# Altium PCB PCB_PowerBoard_7500-0430.PcbDoc (part 5 of 5)
Units mil, origin at the board's own origin, x right, y up, seen from the top; angles counter-clockwise.
Board outline 4000 x 3250 mil, 4 copper layers (Top Layer, Layer 1, Layer 2, Bottom Layer), stack 62.449 mil thick; 205 components, 100 nets, 1585 pads, 235 vias.
Unrouted connection lines stored in the file: 2.
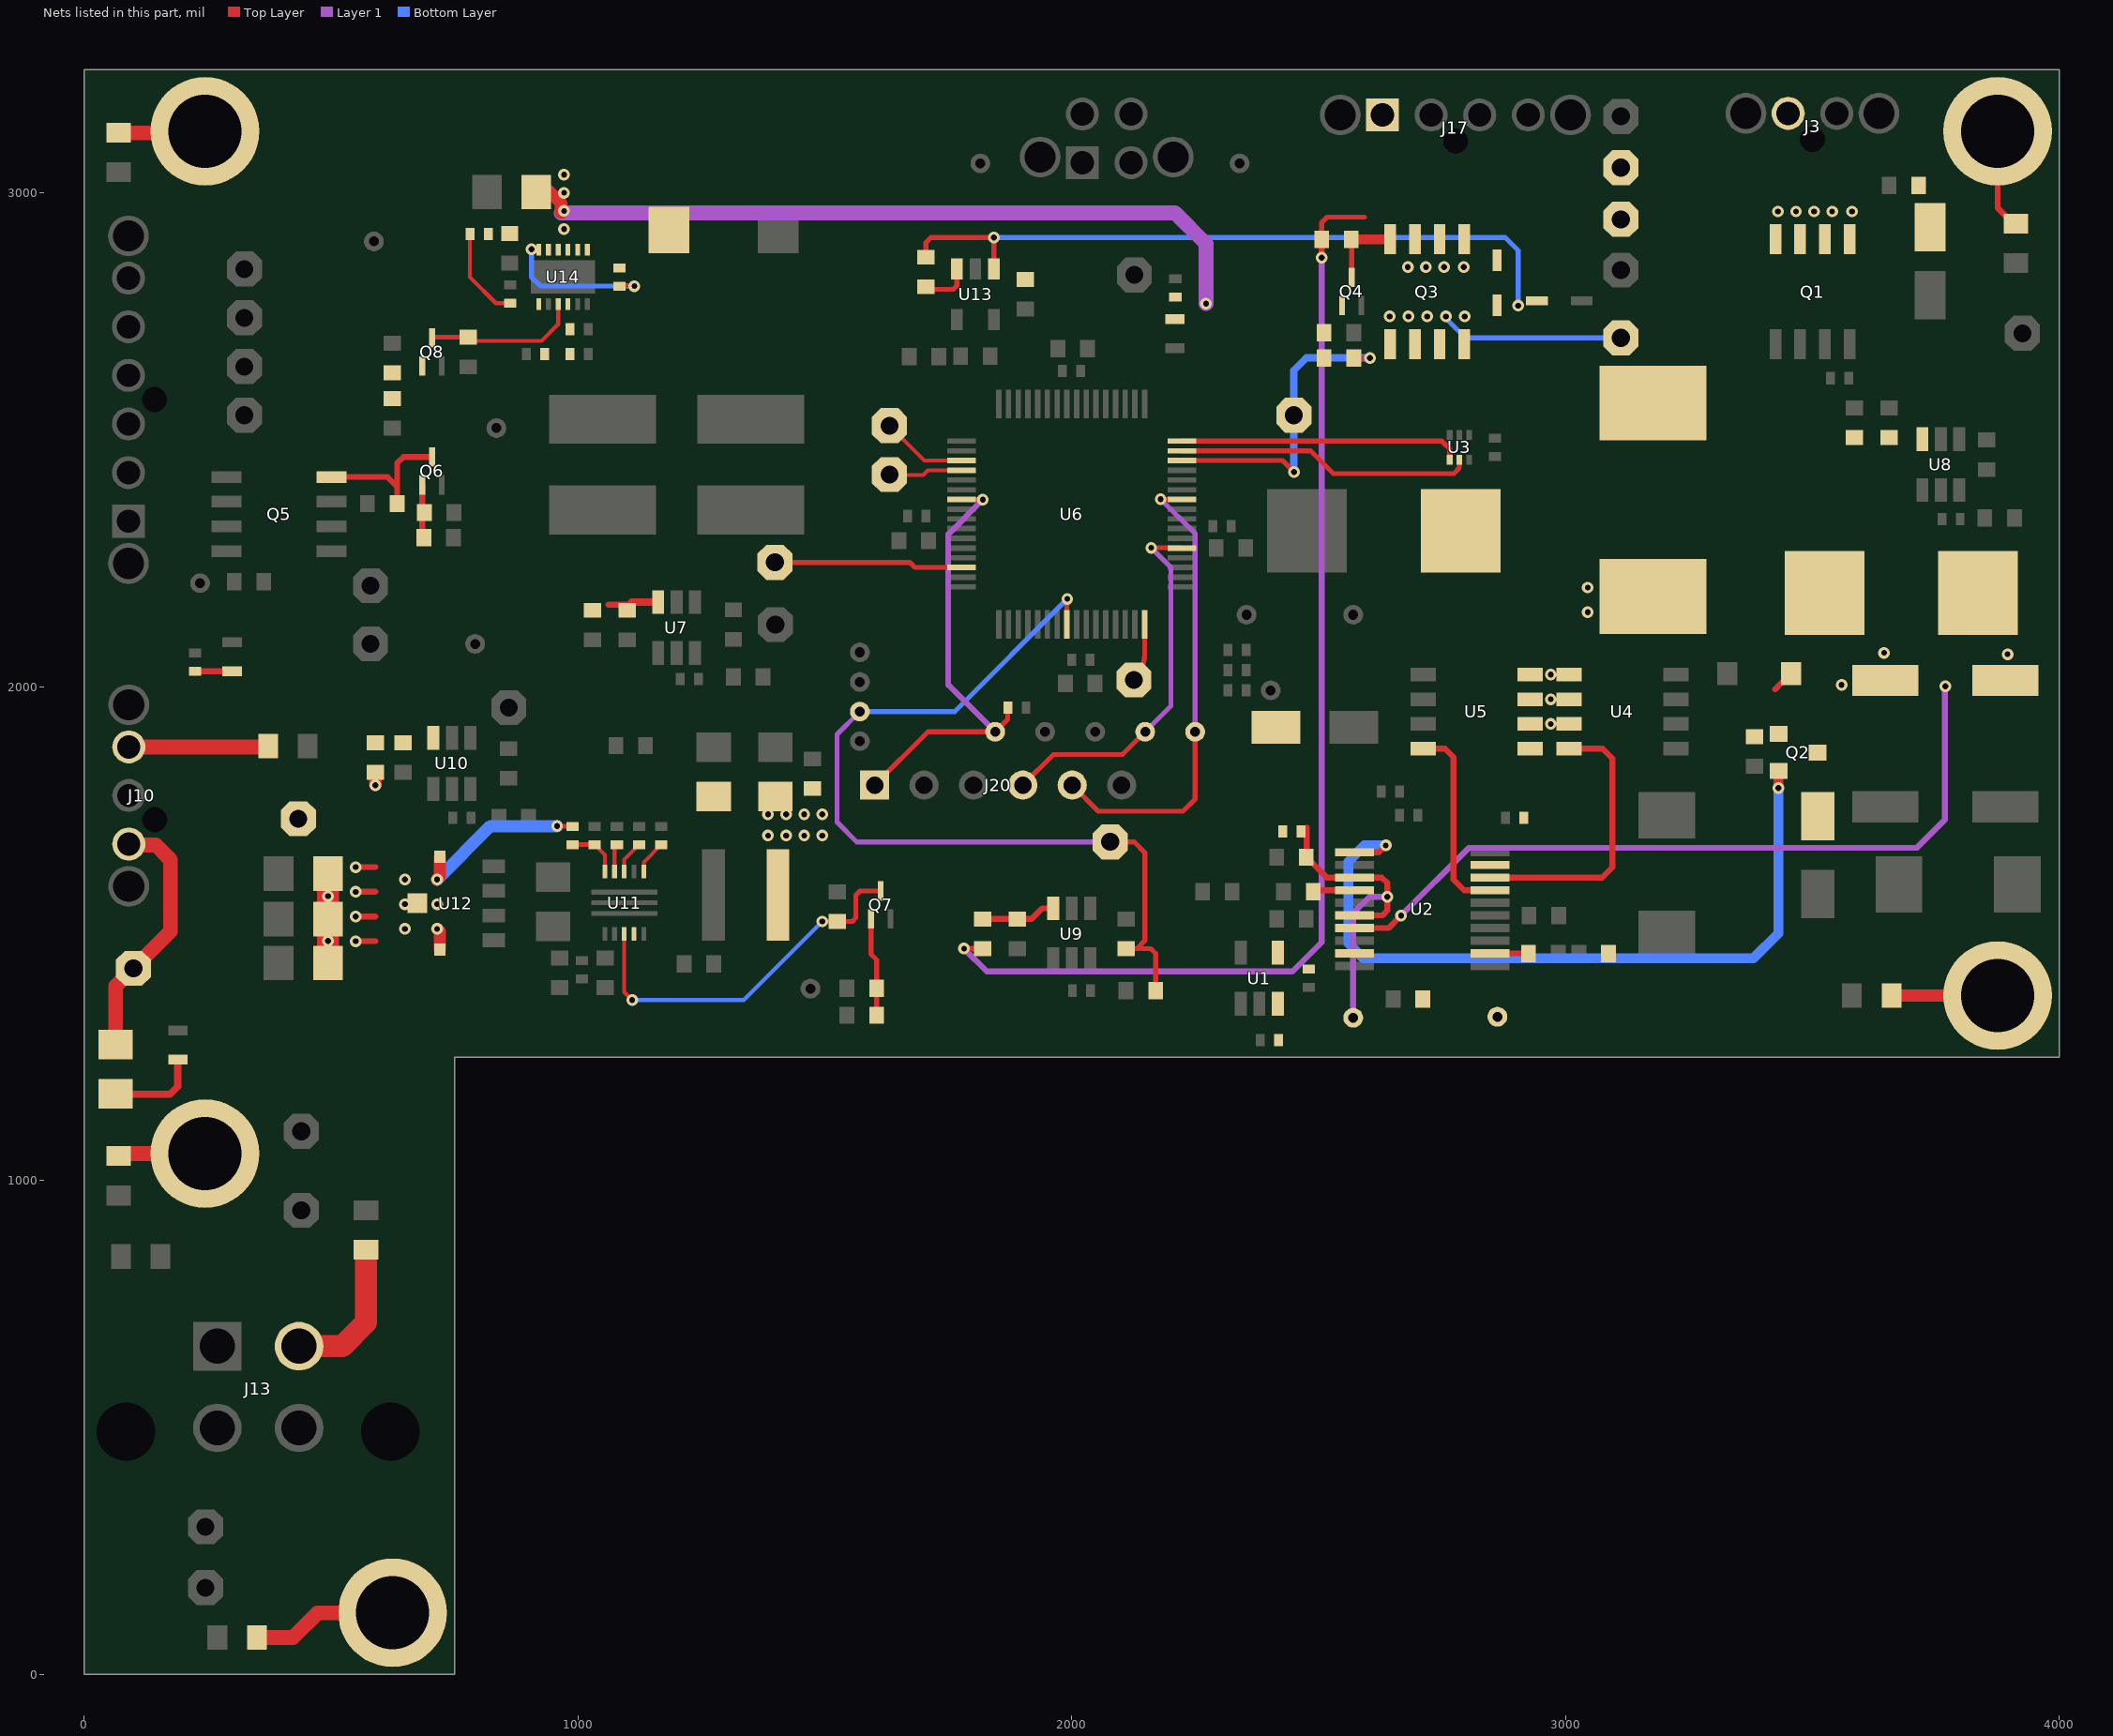
[diagram p5: the nets of this part, all layers, seen from the top]

## Via types
v1: diameter 23.62, hole 11.81, Top Layer to Bottom Layer, tented both sides, 232 vias
v2: diameter 23.62, hole 11.81, Top Layer to Bottom Layer, 3 vias

## Nets (pads, with @x,y where several pads share a name; then routed paths per layer and width w, separated by ;. In a path a pad name is that pad's centre, name@x,y a point inside that pad or via, vN(x,y) a via of type N, cw(c..) or ccw(c..) an arc to the next point about the centre after c; other vN are vias at no path point) (continued)
NetC43_2: C43.2 D6.1 D7.1 R51.1 U13.1 | length 1419.7
  Top Layer w10: R51.1@1705,2870 1705,2900 1715,2910 v1(1842.4,2910) U13.1@1842.4,2846.18
  Bottom Layer w10: v1(1842.4,2910) 2878,2910 2904,2884 v1(2904,2772)
NetC48_1: C48.1 U14.12 | length 304.8
  Top Layer w10: v1@909,2885 v1@909,2885.12 ; C48.1@1084,2811.5 v1(1114.5,2811.5)
  Bottom Layer w10: v1(906,2886) 906,2830 924.5,2811.5 v1(1114.5,2811.5) v1@1116.5,2811.5
NetC49_1: C49.1 R53.1 R55.1 U14.4
NetC50_2: C50.2 R57.2 U14.1 | length 190.7
  Top Layer w8: R57.2@781.5,2917 781.5,2869.71 781.5,2829.5 834,2777 C50.2@863,2777
NetD1_2: D1.2 R3.1
NetD3_2: D3.2 L1.2
NetD4_1: D4.1 Q2.1 R12.1 | length 47
  Top Layer w12: 3424.5,1995 3439,2009.5 3442,2009.5 3456.5,2024 D4.1@3456.5,2027
NetD5_2: D5.2 Q2.3
NetJ13_2: J13.2 R11.2 | length 298.5
  Top Layer w45: J13.2@435.39,664.87 522.87,664.87 571,713 R11.2@571,856
NetJ23_1: J23.1 U6.3 | length 175.1
  Top Layer w8: J23.1@1631,2529 1701.73,2458.27 U6.3@1776.77,2458.27
NetJ25_1: J25.1 U6.4 | length 150.2
  Top Layer w8: J25.1@1631,2430 1632,2429 1699,2429 1708.58,2438.58 U6.4@1776.77,2438.58
NetJ29_1: J29.1 U6.14 | length 382
  Top Layer w10: J29.1@1399,2252 1672.06,2252 1682.33,2241.73 U6.14@1776.77,2241.73
NetJ37_1: J37.1 U6.32 | length 118.6
  Top Layer w10: J37.1@2126,2014 ccw(c2073.76,2066.24) 2147.64,2066.24 U6.32@2147.64,2126.77
NetLED1_1: LED1.1 R42.1 | length 181.1
  Top Layer w15: R42.1@70,1175 174,1175 190,1191 LED1.1@190,1245.47
NetLED2_1: LED2.1 R52.1
NetLED3_1: LED3.1 R54.1 | length 75
  Top Layer w12: R54.1@225,2031.5 LED3.1@300,2031.47
NetMH1_MH: MH1.MH R17.2 | length 292.4
  Top Layer w30: R17.2@353.31,75 423,75 473,125 MH1.MH@625,125
NetMH2_MH: MH2.MH R18.2 | length 176.7
  Top Layer w30: R18.2@70,1053.31 70,1055 MH2.MH@245,1055
NetMH3_MH: MH3.MH R19.2 | length 218
  Top Layer w25: R19.2@3660,1375 MH3.MH@3875,1375 MH3.MH@3875,1378
NetMH4_MH: MH4.MH R20.2 | length 205.3
  Top Layer w12: MH4.MH@3875,3125 3875,2970 3907,2938 R20.2@3912,2938
NetMH5_MH: MH5.MH R21.2 | length 176.2
  Top Layer w29.53: R21.2@70,3122 242,3122 MH5.MH@245,3125
NetQ3_4: Q3.4 Q4.3 R13.2 | length 157.1
  Top Layer w10: R13.2@2566.3,2906.3 R13.2@2566,2906 2567,2906 Q4.3@2567,2829
  Top Layer w20: R13.2@2566.3,2906.3 Q3.4@2645,2906.3
NetQ4_1: Q4.1 R15.2 R16.1
NetQ5_4: Q5.4 Q6.3 R38.1 | length 298.5
  Top Layer w12: Q5.4@501.3,2425 615,2425 634,2406 ; R38.1@634,2371 634,2406 ; Q6.3@704.68,2465.69 646.69,2465.69 634,2453 634,2406
NetQ6_1: Q6.1 R39.2 R41.1 | length 108.2
  Top Layer w12: Q6.1@685,2409 685,2305 R39.2@688,2302
NetQ7_1: Q7.1 R45.2 R46.1 | length 199.7
  Top Layer w10: Q7.1@1593.63,1530 1593.63,1458.37 1605,1447 R45.2@1605,1390 R46.1@1605,1335
NetQ7_3: Q7.3 R100.2 U11.11 | length 762
  Top Layer w8: U11.11@1094,1499.66 1094,1382 v1(1110,1366)
  Top Layer w10: v1(1495,1525) R100.2@1525,1525 1556,1525 1563,1532 1563,1578 1571.69,1586.69 Q7.3@1613.32,1586.69
  Bottom Layer w8: v1(1110,1366) 1336,1366 v1(1495,1525)
NetQ8_1: Q8.1 R58.2 R60.1
NetQ8_3: Q8.3 R56.2 U14.3 | length 313.6
  Top Layer w8: Q8.3@704.68,2706.69 Q8.3@705.99,2708 ; R56.2@778,2708 785.29,2700.71 926.71,2700.71 960.16,2734.16 U14.3@960.16,2774.88
  Top Layer w10: Q8.3@705.99,2708 R56.2@778,2708
NetR5_1: R5.1 U2.12 | length 78
  Top Layer w12: U2.12@2847.44,1460.43 2925,1460.43 R5.1@2925,1460
NetR6_1: R6.1 U2.4 | length 85
  Top Layer w12: R6.1@2489,1585 2492.39,1588.39 U2.4@2572.56,1588.39
NetR26_1: R26.1 R30.2 U7.3 | length 102.7
  Top Layer w12: 1062,2166.5 1103.5,2166.5 1108.57,2171.57
  Top Layer w15: 1108.57,2171.57 U7.3@1162.6,2171.57
NetR27_1: R27.1 R31.2 U8.3
NetR32_1: R32.1 R36.2 U9.3 | length 151.5
  Top Layer w12: R32.1@1820,1530 R36.2@1890,1530 1919,1530 1940.57,1551.57 U9.3@1962.6,1551.57
NetR33_1: R33.1 R37.2 U10.3
NetR44_1: R44.1 R47.2 U11.5 | length 108.4
  Top Layer w8: R47.2@1034,1680.53 1054.63,1659.9 U11.5@1054.63,1625.65
  Top Layer w10: R44.1@989,1680.53 R47.2@1034,1680.53
NetR48_2: R48.2 U11.1 | length 69.6
  Top Layer w8: U11.1@1133.37,1625.65 1133.37,1644.9 R48.2@1169,1680.53
NetR49_2: R49.2 U11.3 | length 67.3
  Top Layer w8: U11.3@1094,1625.65 1094,1650.53 R49.2@1124,1680.53
NetR50_2: R50.2 U11.4 | length 56.8
  Top Layer w8: U11.4@1074.32,1625.65 1074.32,1675.84 R50.2@1079,1680.53
NetR51_2: R51.2 U13.3 | length 101.4
  Top Layer w10: R51.2@1705,2810 1710,2805 1760,2805 1767.6,2812.6 U13.3@1767.6,2846.18
NetU2_17: U2.17 U5.4 | length 399.7
  Top Layer w12: U5.4@2711.73,1875 2756,1875 2773,1858 2773,1610 2794.61,1588.39 U2.17@2847.44,1588.39
NetU2_18: U2.18 U4.4 | length 572.8
  Top Layer w12: U2.18@2847.44,1613.98 3073.98,1613.98 3095,1635 3095,1855 3075,1875 U4.4@3006.73,1875
PC_PWR_12V: C38.2 C39.2 C40.2 J9.1 J10.1 J45.1 R33.2 R42.2 R44.2 U12.5_6 U12.7 U12.8 | length 1296.8
  Top Layer w10: v1(958,1718) 958.47,1717.53 R44.2@989,1717.53
  Top Layer w12: v1(550,1485) 590,1485 ; v1(550,1535) 590,1535 ; v1(550,1585) 590,1585 ; v1(550,1635) 590,1635
  Top Layer w25: v1(590,1801) R33.2@590,1827 ; v1(715,1510) 720.54,1504.46 U12.7@720.54,1468 ; v1(715,1610) 720.54,1615.54 U12.8@720.54,1656
  Top Layer w30: R42.2@64,1276 64,1394 J45.1@100,1430 175,1505 175,1650 145,1680 92,1680 J10.1@90,1682
  Top Layer w45: C40.2@494,1441 C39.2@494,1530 C38.2@494,1622
  Bottom Layer w25: v1(715,1610) 823,1718 v1(958,1718)
  other v1: 494,1485.5 650,1510 650,1560 715,1560 494,1576 650,1610
PC_PWR_CHASSIS: J10.3 R40.2 | length 284
  Top Layer w29.53: R40.2@373,1878.43 R40.2@373,1880
  Top Layer w30: J10.3@90.62,1878.43 R40.2@373,1878.43
PHASE1-2: C48.2 L3.1 U14.7 U14.8
PICKIT3_PGC: J20.5 J26.1 U6.42 | length 960.1
  Top Layer w10: J20.5@2001,1801 2054,1748 2225,1748 2250,1773 J26.1@2250,1909 ; v1@2180.47,2379.53 U6.42@2223.23,2379.53
  Layer 1 w10: v1(2180,2380) 2250,2310 J26.1@2250,1909
PICKIT3_PGD: J20.4 J24.1 U6.37 | length 765.8
  Top Layer w10: J20.4@1901,1801 1963,1863 2102.75,1863 J24.1@2148.75,1909 ; v2(2161,2281.61) 2222.72,2281.61 U6.37@2223.23,2281.1
  Layer 1 w10: J24.1@2148.75,1909 2201,1961.25 2201,2241.61 v2(2161,2281.61)
PSW_MON: C30.1 J39.1 J40.1 R34.2 U6.24 | length 1804.1
  Top Layer w10: U6.24@1990.16,2126.77 1990.16,2177.16 v1(1991,2178) ; J39.1@2078,1686 2126.57,1686 2148,1664.57 2148,1486 2132,1470 ; R34.2@2110,1470 2132,1470 ; R34.2@2110,1472.5 R34.2@2110,1478.04 ; C30.1@2170,1384.35 C30.1@2170,1385 2170,1460 2160,1470 2132,1470
  Layer 1 w10: J40.1@1571,1950 1525,1904 1525,1726 1565,1686 J39.1@2078,1686
  Bottom Layer w10: J40.1@1571,1950 1763,1950 v1(1991,2178)
PSW_OUT: D7.2 J16.1 J17.1 Q3.1 Q3.2 Q3.3 R13.1 R32.2 | length 2353.6
  Top Layer w10: R13.1@2506,2906 2506,2940 2517,2951 2592.54,2951
  Top Layer w12: v1(1782,1470) R32.2@1820,1470 ; v1(2506,2869) R13.1@2506,2906
  Layer 1 w12: v1(1782,1470) 1828,1424 2447,1424 2506,1483 v1(2506,2869)
  other v1: 2680.67,2850 2717.33,2850 2754,2850 2794,2850
REF_4.096V: C6.1 C8.2 J5.1 R4.1 U1.4 U2.9
STAT_LED_R\E\D\/GRN: U3.2 U6.47 | length 602.2
  Top Layer w10: U6.47@2223.23,2477.95 2484.05,2477.95 2530,2432 2774,2432 2785,2443 U3.2@2785,2459.88
STAT_LED_RED/G\R\N\: U3.1 U6.48 | length 570.5
  Top Layer w10: U6.48@2223.23,2497.64 2749.36,2497.64 2750.41,2496.59 ; 2750.41,2496.55 2755.68,2491.28 2765.32,2481.68 U3.1@2765.32,2459.88
U1_CS: D3.1 R7.1 R8.1 U2.7 | length 1556.7
  Top Layer w12: U2.7@2572.56,1511.61 2641.61,1511.61 v1(2667,1537)
  Layer 1 w12: v1(2667,1537) 2804,1674 3711,1674 3768,1731 3768,2000 v1(3769,2001)
  other v1: 3559,2004 3895,2066 3645,2069
U1_IOUT: Q2.2 U2.1 | length 1557.7
  Top Layer w12: U2.1@2572.56,1665.16 2622.16,1665.16 v1(2636,1679)
  Top Layer w20: v2(3431,1795) Q2.2@3431,1828.97
  Top Layer w25: Q2.2@3431,1828.97 Q2.2@3431.63,1829.6
  Bottom Layer w20: v1(2636,1679) 2593,1679 2560,1646 2560,1481 2591,1450 3380,1450 3431,1501 v2(3431,1795)
U1_LX: C10.2 D2.1 L1.1 U2.19 U4.1 U4.2 U4.3 U5.5 U5.6 U5.7 U5.8
  other v1: 2970,1925 2970,1975 2970,2025 3045,2151 3045,2201
U1_VL: C5.1 C7.1 J4.1 R3.2 U1.3 U2.3 U2.6 | length 667.8
  Top Layer w12: 2476,1715 2476,1651.5 2484,1643.5 2487.5,1643.5 2517.02,1613.98 2628.02,1613.98 2639,1603 v1(2639,1575) 2639,1547 2629.2,1537.2 U2.6@2572.56,1537.2
  Layer 1 w12: J4.1@2570,1330 2570,1542 2603,1575 v1(2639,1575)
U14_VDD: C47.2 R57.1 U14.11
V_CHRGR: C1.1 C2.2 J1.1 J3.1 Q1.5 Q1.6 Q1.7 Q1.8
  other v1: 3430,2962.6 3466.67,2962.6 3503.33,2962.6 3540,2962.6 3580,2962.6
VBAT_SW: C31.2 C32.2 C46.2 J19.1 L2.1 Q3.5 Q3.6 Q3.7 Q3.8 R14.2 U11.12 U14.9 U14.10 | length 1864.8
  Top Layer w25: C46.2@940,3005 966,2979 v1@966,2960
  Layer 1 w30: v1@966,2960 2209,2960 2272,2897 v1(2272,2776)
  Bottom Layer w10: v1@2754,2750 2797.33,2706.67 J19.1@3092,2706.67
  other v1: 1385,1699 1421.67,1699 1458.33,1699 1495,1699 1385,1742 1421.67,1742 1458.33,1742 1495,1742 2644,2750 2682,2750 2720,2750 2758,2750 2796,2750 972,2927 972,2963.67 972,3000.33 972,3037
VBATSW_EN: J18.1 R15.1 U6.46 | length 639.8
  Top Layer w10: U6.46@2223.23,2458.27 2426.73,2458.27 v1(2450,2435) ; R15.1@2571,2666 v1(2604,2666)
  Bottom Layer w15: v1(2450,2435) J18.1@2450,2550 2450,2641 2475,2666 v1(2604,2666)
VPP_M\C\L\R\: J20.1 J22.1 R22.1 U6.7 | length 929.5
  Top Layer w10: J20.1@1601,1801 1709,1909 J22.1@1845,1909 1870.5,1934.5 R22.1@1870.5,1958 ; U6.7@1776.77,2379.53 v1@1819.53,2379.53
  Layer 1 w12: v1(1820,2379.06) 1750,2309.06 1750,2004 J22.1@1845,1909
pads on no net: J3. J3.S1 J3.S2 J7.3 J7.4 J7.S1 J7.S2 J10. J10.S1 J10.S2 J13. J17. J17.S1 J17.S2 J20.6 J43. J43.S1 J43.S2 U1.1 U1.5 U6.5 U6.6 U6.8 U6.11 U6.12 U6.13 U6.21 U6.22 U6.23 U6.28 U6.29 U6.30 U6.31 U6.36 U6.39 U6.40 U6.43 U6.44 U6.45 U6.53 U6.54 U6.55 U6.58 U6.59 U6.60 U6.61 U6.62 U6.63 U6.64 U13.4

## Polygon pours and split planes (outlines as drawn)
GND on Top Layer "GND_L01_P031" (solid, remove dead copper, pour order 31): 0,0 750,0 750,1250 4000,1250 4000,3250 0,3250
DCIN_S on Top Layer "DCIN_S_L01_P007" (solid, remove dead copper, pour order 7): 3405,2600 3405,2550 3605,2550 3605,2585 3546,2585 3546,2767 3405,2767
U1_LX on Top Layer "U1_LX_L01_P008" (solid, remove dead copper, pour order 8): 2690,2205 2690,2090 2900,2090 2900,1650 2805,1650 2805,1630 3075,1630 3075,2100 3295,2100 3295,2410 2690,2410
5VPIC on Top Layer "5VPIC_L01_P011" (solid, remove dead copper, pour order 11): 2230,2883 2232,2881 2232,2819 2226,2813 2187,2813 2181,2807 2181,2795 1995.69,2795 1995.69,2542 1982.69,2542 1982.69,2620 1819,2620 1819,2767 1869,2767 1869,2730 1943.69,2730 1943.69,2883
NetC36_2 on Top Layer "NETC36_2_L01_P036" (solid, remove dead copper, pour order 36): 998,1568 994,1568 902,1568 902,1604 801,1604 801,1373 979,1373 979,1421 912,1421 912,1477 998,1477 998,1535 1168,1535 1168,1548 998,1548
5V_OK on Top Layer "5V_OK_L01_P035" (solid, pour order 35): 1713,2717 1748,2717 1748,2504 1807,2504 1807,2490 1717,2490 1713,2490
12V_MON on Top Layer "12V_MON_L01_P034" (solid, remove dead copper, pour order 34): 834,1780 883,1780 883,1711 940,1711 940,2020 810,2020 810,1911 899,1911 899,1831 834,1831
BUFFOUT4 on Top Layer "BUFFOUT4_L01_P033" (solid, remove dead copper, pour order 33): 691,1766 720,1766 720,1844 881,1844 881,1902 798,1902 798,1927 767,1927 767,1864 691,1864
5VPIC on Top Layer "5VPIC_L01_P010" (solid, remove dead copper, pour order 10): 2036,2158 2036,2071 2075,2071 2075,1986 2023,1986 2023,2158 2023,1986 2023,2158
DCIN_S on Top Layer "DCIN_S_L01_P029" (solid, remove dead copper, pour order 29): 3349,2087 3349,1687 3127,1687 3127,2087
IB_PWR_5V on Top Layer "IB_PWR_5V_L01_P028" (solid, remove dead copper, pour order 28): 212,2440 212,2372 20,2372 20,2145 330,2145 330,2440
5V on Top Layer "5V_L01_P026" (solid, remove dead copper, pour order 26): 1013,2746 1013,2693 1013,2746 1005,2746 1005,2598 934,2598 934,2454 1540,2454 1540,2972 1446.33,2972 1446.33,2746
U14_VDD on Top Layer "U14_VDD_L01_P025" (solid, remove dead copper, pour order 25): 933,2873 933,2903 807,2903 807,2941 946,2941 946,2873
NetC49_1 on Top Layer "NETC49_1_L01_P024" (solid, remove dead copper, pour order 24): 985,2788 985,2742 998,2742 998,2655 921,2655 921,2687 974,2687 974,2788
VBAT_SW on Top Layer "VBAT_SW_L01_P023" (solid, remove dead copper, pour order 23): 885,2947 954,2947 954,2873 985,2873 985,3053 885,3053
PHASE1-2 on Top Layer "PHASE1-2_L01_P022" (solid, remove dead copper, pour order 22): 1143,2976 1143,2837 1055,2837 1055,2873 993,2873 993,2976
PSW_OUT on Top Layer "PSW_OUT_L01_P018" (solid, remove dead copper, pour order 18): 2665,2899 2665,2819 2914,2819 2914,2900 3160,2900 3160,2998 2662,2998 2662,3229 2557,3229 2557,2945 2665,2945
5VPIC on Top Layer "5VPIC_L01_P015" (solid, remove dead copper, pour order 15): 1693,2361.68 1737,2361.68 1737,2326.68 1806,2326.68 1806,2313.68 1737,2313.68 1737,2274.68 1693,2274.68
NetD3_2 on Top Layer "NETD3_2_L01_P014" (solid, remove dead copper, pour order 14): 3306,2476 3432,2476 3432,2097 3604,2097 3604,2454 3481,2454 3481,2534 3306,2534
BATT+ on Top Layer "BATT+_L01_P013" (solid, remove dead copper, pour order 13): 3964,1790 3964,1683 3746,1683 3746,1480 3416,1480 3416,1663 3571,1663 3571,1790
5VPIC on Top Layer "5VPIC_L01_P012" (solid, remove dead copper, pour order 12): 2307,2342 2263,2342 2263,2307 2194,2307 2194,2294 2263,2294 2263,2255 2307,2255
NetD1_2 on Top Layer "NETD1_2_L01_P009" (solid, pour order 9): 2359,1846 2402,1846 2402,1691 2440,1691 2440,1847 2474,1847 2474,1959 2359,1959
V_CHRGR on Top Layer "V_CHRGR_L01_P006" (solid, remove dead copper, pour order 6): 3410,2865 3780,2865 3780,3035 3690.5,3035 3690.5,2978 3500,2978 3500,3230 3410,3230
REF_4.096V on Top Layer "REF_4.096V_L01_P004" (solid, remove dead copper, pour order 4): 3072,1367 2691,1367 2691,1289 3103,1289 3103,1480 3072,1480
U1_VL on Top Layer "U1_VL_L01_P002" (solid, remove dead copper, pour order 2): 2404,1383 2438,1383 2438,1365 2609,1365 2609,1257 2404,1257
REF_4.096V on Top Layer "REF_4.096V_L01_P001" (solid, pour order 1): 2732,1451 2732,1347 2691,1347 2691,1451 2503,1451 2503,1418 2391,1418 2391,1494 2520,1494 2520,1471 2732,1471
VBAT_SW on Top Layer "VBAT_SW_L01_P000" (solid, remove dead copper, pour order 0): 1361,1697 1224,1697 1224,1816 1508,1816 1508,1687 1447,1687 1447,1387 1106,1387 1106,1516 1121,1516 1121,1398 1361,1398
V_CHRGR on Layer 2 "V_CHRGR_L03_P017" (solid, remove dead copper, pour order 17): 3287,3000 3287,2917 3747,2917 3747,3076.76 3597,3076.76 3597,3232 3287,3232 3287,3104 3038,3104 3038,3000
PC_PWR_12V on Layer 2 "PC_PWR_12V_L03_P037" (solid, remove dead copper, pour order 37): 696,1841 696,1703 730,1703 730,1430 169,1430 169,1376 24,1376 24,1841
BATT+ on Layer 2 "Polygon_1_Net_BATT+" (solid, remove dead copper, pour order 3): 2834,1698 2834,2287 3016,2287 3016,3241 2840,3241 2840,2612 2493,2612 2493,1501 750,1501 750,1411 350,1411 350,850 730,850 730,1270 3991,1270 3991,1698
DCIN_S on Layer 2 "DCIN_S_L03_P005" (solid, remove dead copper, pour order 5): 3040,2285 3130.65,2285 3131.34,1733 3497,1733 3497,2197 3589,2197 3589,2895 3040,2895
GND on Layer 2 "GND_L03_P040" (solid, remove dead copper, pour order 40): 0,0 750,0 750,1250 4000,1250 4000,3250 0,3250
U1_LX on Layer 2 "Polygon_1_Net_U1_CS" (solid, remove dead copper, pour order 39): 2866,1735 2866,2248.25 3094,2248.25 3094,1735
U1_CS on Layer 2 "Polygon_1_Net_U1_CS" (solid, remove dead copper, pour order 38): 3536,2110 3988.5,2110 3988.5,1896 3536,1896
5VPIC on Layer 2 "5VPIC_L03_P016" (solid, remove dead copper, pour order 16): 750,1728 717,1728 717,1806 717,1943 1218,1943 1218,1669 1914,1669 1914,2236 1808,2236 1808,2613 2325,2613 2325,1515 750,1515
VBAT_SW on Layer 2 "Polygon_1_Net_VBAT_SW" (solid, remove dead copper, pour order 20): 1899,2223 1891,2223 1791,2223 1791,2635.64 2818,2635.64 2818,2811 1714.5,2811 1714.5,1942 1236,1942 1236,1685.64 1899,1685.64
5V on Layer 2 "Polygon_1_Net_5V" (solid, remove dead copper, pour order 21): 1699,1959 1699,2885 1350,2885 1350,2755.5 399.5,2755.5 399.5,1959
IB_PWR_5V on Layer 2 "IB_PWR_5V_L03_P027" (solid, remove dead copper, pour order 27): 338,2448 338,2115 20,2115 20,2448
PSW_OUT on Layer 2 "PSW_OUT_L03_P019" (solid, remove dead copper, pour order 19): 2558,2824 2814,2824 2814,3071 2680,3071 2680,3237 2558,3237
GND on Layer 1 "GND_L02_P030" (solid, remove dead copper, pour order 30): 0,0 750,0 750,1250 4000,1250 4000,3250 0,3250
GND on Bottom Layer "GND_L04_P032" (solid, remove dead copper, pour order 32): 0,0 750,0 750,1250 4000,1250 4000,3250 0,3250

## Other copper
Top Layer:
  rectangle net 5V_MON: 1352,2002 1397,2062
  rectangle net NetR33_1: 570,1873 720,1923
  rectangle net NetR27_1: 3564,2469 3736,2536
  rectangle net VBAT_SW: 1361,1421 1447,1720
  rectangle net NetD3_2: 3351,2454 3481,2538
  rectangle net NetD3_2: 3058,2454 3398,2648
  rectangle net PHASE1-2: 1054,2836 1231,2976
  rectangle net 5V: 1344,2743 1542,2975
  rectangle net VBAT_SW: 2625,2640 2818,2766
  rectangle net U1_VL: 2455,1634 2495,1723
  rectangle net U1_LX: 2900,2021 3075,2115
  rectangle net U1_LX: 2813,2106 3286,2260
  region net NetD4_1: 3477,2000 3477,2056.58 3399,2056.58 3399,2000
  rectangle net NetC48_1: 893,2872 926,2899
  rectangle net BATT+: 393,895 600,991
  rectangle net PC_PWR_12V: 463,1392 771,1672
  rectangle net 5V: 1525,2639 1687,2699
  rectangle net GND: 715,2630 753,2678
  rectangle net BATT-: 52,830 98,876
  rectangle net 5VPIC: 729,1718 756,1823
  rectangle net 5VPIC: 729,1766 797,1823
  rectangle net 5VPIC: 2301,1974 2329,2115
  rectangle net NetC12_1: 2307,1567 2446,1604
  rectangle net GND: 1951,1983 2011,2071
  rectangle net 5V_MON: 1352,2049 1609,2167
  rectangle net GND: 1081,2080 1126,2110
  rectangle net NetQ8_1: 606,2569 691,2670
  rectangle net 5VPIC: 1187,1999 1220,2095
  rectangle net 5VPIC: 1187,2042 1252,2095
  rectangle net 5V: 400,2258 596,2400
  rectangle net 5V: 212.5,2056 237.5,2079
  rectangle net 5V_MON: 1292,2079 1376,2115
  rectangle net BUFFOUT3: 1225,2137 1340,2196
  rectangle net NetR26_1: 1007,2137 1117,2196
  rectangle net NetC50_2: 849,2762 926,2787
  rectangle net NetLED2_1: 2190,2735 2230,2800
  rectangle net NetC43_2: 1830,2810 1925,2870
  rectangle net DCIN_S: 3009,2769 3160,2888
  rectangle net NetC43_2: 2829,2745 2965,2800
  rectangle net NetQ4_1: 2496,2753 2553,2792
  rectangle net NetQ4_1: 2496,2645 2529,2791
  rectangle net BUFFOUT1: 3783,2475 3876,2532
  rectangle net DCIN_MON: 3833,2425 3932,2459
  rectangle net DCIN_MON: 3892,2323 3932,2459
  rectangle net 5VPIC: 3746,2328 3771,2424
  rectangle net 5VPIC: 3746,2372 3810,2424
  rectangle net U1_CS: 3746,1980 3966,2293
  rectangle net U1_CS: 3540,1958 3966,2081
  rectangle net NetD4_1: 3364,1881 3451,2056
  rectangle net NetD5_2: 3470,1688 3547,1894
  region net NetC10_1: 2623,1956.16 2520.44,1956.16 2520.44,1810.16 2623,1810.16
  rectangle net NetC10_1: 2805,1657 2890,1803
  rectangle net BATT_THERM+: 2967,1386 3044,1479
  rectangle net 5VPIC: 1987,1368 2014,1473
  rectangle net 5VPIC: 1987,1423 2051,1473
  rectangle net L1_OUT: 1238,1420 1302,1687
  rectangle net L1_OUT: 1026,1555 1267,1569
  rectangle net NetC36_2: 944,1373 1021,1421
  rectangle net NetC37_1: 921,1434 1021,1466
  rectangle net NetC36_2: 1156,1535 1168,1547.01
  rectangle net BATT+: 565,917 596,962
  pour cut-out: 2926,2632 3418,2632 3418,2086 2926,2086
  pour cut-out: 1238,1687 1238,1472 1447,1472 1447,1687
  pour cut-out: 1144,3078 1452,3078 1452,2770 1142,2770 1142,3077
Layer 1:
  rectangle net VBAT_SW: 921,2913 997,3057
  rectangle net NetC10_1: 2520.44,1766 2890,1845

## Silkscreen, mask and mechanical layers (free items; w line width, h text height)
Top Overlay:
  region: 1295,3099.41 1295,3229.41 1695,3229.41 1695,3099.41
  lines w5: 2352,1650 2396,1650
  lines w8: 380,3150 475,3230 570,3150 490,3060 490,3132 525,3132 525,3168 425,3168 425,3132 460,3132 460,3060 380,3150
  text "TransTech Systems, Inc" at 595,3193 h54.25
  text "PCB: 1700-0003 REV-A" at 595,3143 h54.25
  text "GND" at 3162,3136.7 h60
  text "PCA: 7500-0430 REV-A" at 595,3093 h54.25
  text "LEDRED" at 1568,3041 h60
  text "VCHRGR" at 3161,3032.7 h60
  text "LEDBLK" at 2265,2987 h60
  text "5VOK" at 460,2933.7 h60
  text "PSWOUT" at 3161,2926.7 h60
  text "!SS" at 376,2827.7 h60
  text "DCINS" at 3161,2824.7 h60
  text "5VPIC" at 2003,2748.7 h60
  text "SCLK" at 376,2729.04 h60
  text "VBATSW" at 3161,2686.7 h60
  text "MISO" at 376,2631.37 h60
  text "DCIN" at 3861,2627.64 h60
  text "MON" at 3856,2572 h60
  text "VBATSWEN" at 2501,2532.7 h60
  text "MOSI" at 376,2531.7 h60
  text "RG0" at 1483,2510.7 h60
  text "!5VEN" at 760,2436.7 h60
  text "RG1" at 1489.03,2411.7 h60
  text "RF4" at 1448,2222 h60
  text "IBPWREN" at 631,2187 h60
  text "5VIB" at 180,2140.7 h60
  text "SCL" at 2386,2126.7 h60
  text "SDA" at 2602,2126.7 h60
  text "5VMON" at 1451,2108.7 h60
  text "5VTP" at 835,2071.7 h60
  text "5V" at 631,2069.7 h60
  text "5V2AD" at 1607,2053.53 h45
  text "!INT" at 2385,2022 h60
  text "12V2AD" at 1607,1994.78 h45
  text "12VMON" at 911,1937.7 h60
  text "PSW2AD" at 1607,1935.11 h45
  text "DCIN2AD" at 1607,1875.48 h45
  text "12VTP" at 365,1784 h60
  text "PSWMON" at 2129,1668.7 h60
  text "12V" at 57,1481 h60
  text "!12VEN" at 1262,1369 h60
  text "U1REF" at 2900,1314.7 h60
  text "U1VL" at 2605,1285.7 h60
  text "BATT-(GND)" at 423.78,1160.85 h50
  text "BATT+" at 422.28,990.43 h60
  text "THERM+" at 297,280 h60
  text "THERM-" at 297,158 h60
Board_Outline:
  the board outline again, w10
Mechanical 4:
  drawing of 506 lines, arcs and shapes, not listed
  text "2" at 3695,3160 h54.25 r180
  text "1" at 1875,3060 h54.25
  text "2" at 2275,3060 h54.25
  text "1" at 2629.13,3058.98 h54.25
  text "4" at 2929.13,3058.98 h54.25
  text "+" at 3788,2974 h100.75 r270
  text "1" at 2691,2892 h54.25
  text "1" at 1855,2845 h54.25
  text "K" at 2765,2785 h54.25 r180
  text "K" at 2915,2760 h54.25 r90
  text "1" at 3409,2708 h54.25 r180
  text "K" at 2220,2690 h46.5 r180
  text "1" at 3810,2590 h54.25
  text "49" at 2159,2559 h54.25
  text "1" at 1793,2509 h54.25
  text "1" at 200,2355 h77.5 r180
  text "K" at 2890,2355 h77.5
  text "K" at 3865,2350 h77.5
  text "1" at 487,2259 h54.25 r270
  text "1" at 1255,2175 h54.25
  text "33" at 2207,2153 h54.25
  text "17" at 1843,2105 h54.25
  text "K" at 270,2085 h46.5
  text "1" at 2653,2041 h54.25 r90
  text "1" at 3023,2041 h54.25 r90
  text "K" at 3305.91,1985.08 h48.83 r270
  text "1" at 795,1895 h54.25
  text "1" at 1515,1795 h54.25
  text "K" at 2535,1795 h77.5 r180
  text "1" at 2575,1680 h77.5 r90
  text "1" at 170,1675 h77.5 r270
  text "1" at 1185,1640 h54.25
  text "1" at 2050,1550 h54.25
  text "K" at 3375,1480 h77.5 r90
  text "1" at 805,1450 h54.25 r270
  text "1" at 2330,1360 h77.5 r180
  text "K" at 160,1310 h46.5
  text "1" at 307,818 h77.5 r180
  text "2" at 464,817 h77.5 r180
  text "(GND)" at 324.26,128.35 h54.25
Mechanical 6:
  the board outline again, w5
Fabrication:
  drawing of 295 lines, arcs and shapes, not listed
  text "Layer" at 4556.09,1261 h60
  text "Name" at 4966,1261 h60
  text "Material" at 5895.74,1261 h60
  text "Thickness" at 6755.51,1261 h60
  text "Constant" at 7405.35,1261 h60
  text "Board Layer Stack" at 7975.21,1261 h60
  text "Top Overlay" at 4966,1141 h60
  text "Top Solder" at 4966,1021 h60
  text "Solder Resist" at 5895.74,1021 h60
  text "0.40mil" at 6755.51,1021 h60
  text "3.5" at 7405.35,1021 h60
  text "1" at 4556.09,901 h60
  text "Top Layer" at 4966,901 h60
  text "1.38mil" at 6755.51,901 h60
  text "Dielectric 2" at 4966,781 h60
  text "PP-006" at 5895.74,781 h60
  text "8.28mil" at 6755.51,781 h60
  text "4.4" at 7405.35,781 h60
  text "2" at 4556.09,661 h60
  text "Layer 1" at 4966,661 h60
  text "CF-004" at 5895.74,661 h60
  text "0.60mil" at 6755.51,661 h60
  text "Dielectric 1" at 4966,541 h60
  text "FR-4" at 5895.74,541 h60
  text "41.93mil" at 6755.51,541 h60
  text "4.6" at 7405.35,541 h60
  text "3" at 4556.09,421 h60
  text "Layer 2" at 4966,421 h60
  text "CF-004" at 5895.74,421 h60
  text "0.60mil" at 6755.51,421 h60
  text "Dielectric 3" at 4966,301 h60
  text "PP-006" at 5895.74,301 h60
  text "8.28mil" at 6755.51,301 h60
  text "4.4" at 7405.35,301 h60
  text "4" at 4556.09,181 h60
  text "Bottom Layer" at 4966,181 h60
  text "1.38mil" at 6755.51,181 h60
  text "Bottom Solder" at 4966,61 h60
  text "Solder Resist" at 5895.74,61 h60
  text "0.40mil" at 6755.51,61 h60
  text "3.5" at 7405.35,61 h60
  text "Bottom Overlay" at 4966,-59 h60
  text "Total board thickness:" at 4556.09,-179 h60
  text "63.25mil" at 6755.51,-179 h60
Drill Drawing:
  circle w10: c4580.62,2189.83 r33.33
  lines w10: 4547.29,1723.17 4563.96,1723.17 4563.96,1706.5 4597.29,1706.5 4597.29,1723.17 4613.96,1723.17 4613.96,1756.5 4597.29,1756.5 4597.29,1773.17 4563.96,1773.17 4563.96,1756.5 4547.29,1756.5 4547.29,1723.17 ; 4547.29,1889.83 4580.62,1856.5 4613.96,1889.83 4580.62,1923.17 4547.29,1889.83 ; 4547.29,2006.5 4547.29,2023.17 4563.96,2039.83 4547.29,2056.5 4547.29,2073.17 4563.96,2073.17 4580.62,2056.5 4597.29,2073.17 4613.96,2073.17 4613.96,2056.5 4597.29,2039.83 4613.96,2023.17 4613.96,2006.5 4597.29,2006.5 4580.62,2023.17 4563.96,2006.5 4547.29,2006.5 ; 4547.29,2373.17 4613.96,2373.17 4580.62,2306.5 4547.29,2373.17 ; 4547.29,2473.17 4563.96,2473.17 4580.62,2456.5 4597.29,2473.17 4613.96,2473.17 4597.29,2489.83 4613.96,2506.5 4597.29,2506.5 4580.62,2523.17 4563.96,2506.5 4547.29,2506.5 4563.96,2489.83 4547.29,2473.17 ; 4547.29,2606.5 4613.96,2606.5 4613.96,2673.17 4547.29,2673.17 4547.29,2606.5 ; 4547.29,2756.5 4580.62,2773.17 4613.96,2756.5 4597.29,2789.83 4613.96,2823.17 4580.62,2806.5 4547.29,2823.17 4563.96,2789.83 4547.29,2756.5 ; 4547.29,2906.5 4613.96,2906.5 4613.96,2973.17 4547.29,2973.17 4547.29,2906.5 ; 4547.29,3056.5 4580.62,3073.17 4613.96,3056.5 4597.29,3089.83 4613.96,3123.17 4580.62,3106.5 4547.29,3123.17 4563.96,3089.83 4547.29,3056.5 ; 4560.62,2919.83 4600.62,2919.83 4600.62,2959.83 4560.62,2959.83 4560.62,2919.83 ; 4560.62,3069.83 4580.62,3079.83 4600.62,3069.83 4590.62,3089.83 4600.62,3109.83 4580.62,3099.83 4560.62,3109.83 4570.62,3089.83 4560.62,3069.83
  lines w15: 4487.5,1661.5 13910.9,1661.5 ; 4487.5,3161.5 13910.9,3161.5 ; 5038.38,1511.5 5038.38,3311.5 ; 5638.22,1511.5 5638.22,3311.5 ; 6787.88,1511.5 6787.88,3311.5 ; 7293.76,1511.5 7293.76,3311.5 ; 8027.56,1511.5 8027.56,3311.5 ; 9527.11,1511.5 9527.11,3311.5 ; 10116.96,1511.5 10116.96,3311.5 ; 10862.76,1511.5 10862.76,3311.5 ; 11642.54,1511.5 11642.54,3311.5 ; 12508.3,1511.5 12508.3,3311.5 ; 4487.5,1511.5 13910.9,1511.5 13910.9,3311.5 4487.5,3311.5 4487.5,1511.5
  text "Symbol" at 4577.5,3206.5 h72
  text "Count" at 5083.38,3206.5 h72
  text "Hole Size" at 5683.22,3206.5 h72
  text "Plated" at 6832.88,3206.5 h72
  text "Hole Type" at 7338.76,3206.5 h72
  text "Drill Layer Pair" at 8072.56,3206.5 h72
  text "Via/Pad" at 9572.11,3206.5 h72
  text "Pad Shape" at 10161.96,3206.5 h72
  text "Template" at 10907.76,3206.5 h72
  text "Hole Length" at 11687.54,3206.5 h72
  text "Routed Path Length" at 12553.3,3206.5 h72
  text "235" at 5083.38,3056.5 h60
  text "11.81mil (0.300mm)" at 5683.22,3056.5 h60
  text "PTH" at 6832.88,3056.5 h60
  text "Round" at 7338.76,3056.5 h60
  text "Top Layer - Bottom Layer" at 8072.56,3056.5 h60
  text "Via" at 9572.11,3056.5 h60
  text "Rounded" at 10161.96,3056.5 h60
  text "(Mixed)" at 10907.76,3056.5 h60
  text "-" at 11687.54,3056.5 h60
  text "-" at 12553.3,3056.5 h60
  text "21" at 5083.38,2906.5 h60
  text "20.00mil (0.508mm)" at 5683.22,2906.5 h60
  text "PTH" at 6832.88,2906.5 h60
  text "Round" at 7338.76,2906.5 h60
  text "Top Layer - Bottom Layer" at 8072.56,2906.5 h60
  text "Pad" at 9572.11,2906.5 h60
  text "Rounded" at 10161.96,2906.5 h60
  text "c102h51" at 10907.76,2906.5 h60
  text "-" at 11687.54,2906.5 h60
  text "-" at 12553.3,2906.5 h60
  text "6" at 5083.38,2756.5 h60
  text "35.43mil (0.900mm)" at 5683.22,2756.5 h60
  text "PTH" at 6832.88,2756.5 h60
  text "Round" at 7338.76,2756.5 h60
  text "Top Layer - Bottom Layer" at 8072.56,2756.5 h60
  text "Pad" at 9572.11,2756.5 h60
  text "(Mixed)" at 10161.96,2756.5 h60
  text "(Mixed)" at 10907.76,2756.5 h60
  text "-" at 11687.54,2756.5 h60
  text "-" at 12553.3,2756.5 h60
  text "27" at 5083.38,2606.5 h60
  text "36.22mil (0.920mm)" at 5683.22,2606.5 h60
  text "PTH" at 6832.88,2606.5 h60
  text "Round" at 7338.76,2606.5 h60
  text "Top Layer - Bottom Layer" at 8072.56,2606.5 h60
  text "Pad" at 9572.11,2606.5 h60
  text "Octagonal" at 10161.96,2606.5 h60
  text "s180h92c50" at 10907.76,2606.5 h60
  text "-" at 11687.54,2606.5 h60
  text "-" at 12553.3,2606.5 h60
  text "19" at 5083.38,2456.5 h60
  text "47.24mil (1.200mm)" at 5683.22,2456.5 h60
  text "PTH" at 6832.88,2456.5 h60
  text "Round" at 7338.76,2456.5 h60
  text "Top Layer - Bottom Layer" at 8072.56,2456.5 h60
  text "Pad" at 9572.11,2456.5 h60
  text "Rounded" at 10161.96,2456.5 h60
  text "(Mixed)" at 10907.76,2456.5 h60
  text "-" at 11687.54,2456.5 h60
  text "-" at 12553.3,2456.5 h60
  text "4" at 5083.38,2306.5 h60
  text "51.18mil (1.300mm)" at 5683.22,2306.5 h60
  text "NPTH" at 6832.88,2306.5 h60
  text "Round" at 7338.76,2306.5 h60
  text "Top Layer - Bottom Layer" at 8072.56,2306.5 h60
  text "Pad" at 9572.11,2306.5 h60
  text "Rounded" at 10161.96,2306.5 h60
  text "(Mixed)" at 10907.76,2306.5 h60
  text "-" at 11687.54,2306.5 h60
  text "-" at 12553.3,2306.5 h60
  text "10" at 5083.38,2156.5 h60
  text "62.99mil (1.600mm)" at 5683.22,2156.5 h60
  text "PTH" at 6832.88,2156.5 h60
  text "Round" at 7338.76,2156.5 h60
  text "Top Layer - Bottom Layer" at 8072.56,2156.5 h60
  text "Pad" at 9572.11,2156.5 h60
  text "Rounded" at 10161.96,2156.5 h60
  text "c210h160m218" at 10907.76,2156.5 h60
  text "-" at 11687.54,2156.5 h60
  text "-" at 12553.3,2156.5 h60
  text "4" at 5083.38,2006.5 h60
  text "70.87mil (1.800mm)" at 5683.22,2006.5 h60
  text "PTH" at 6832.88,2006.5 h60
  text "Round" at 7338.76,2006.5 h60
  text "Top Layer - Bottom Layer" at 8072.56,2006.5 h60
  text "Pad" at 9572.11,2006.5 h60
  text "(Mixed)" at 10161.96,2006.5 h60
  text "(Mixed)" at 10907.76,2006.5 h60
  text "-" at 11687.54,2006.5 h60
  text "-" at 12553.3,2006.5 h60
  text "2" at 5083.38,1856.5 h60
  text "118.11mil (3.000mm)" at 5683.22,1856.5 h60
  text "NPTH" at 6832.88,1856.5 h60
  text "Round" at 7338.76,1856.5 h60
  text "Top Layer - Bottom Layer" at 8072.56,1856.5 h60
  text "Pad" at 9572.11,1856.5 h60
  text "Rounded" at 10161.96,1856.5 h60
  text "c0hn300m8" at 10907.76,1856.5 h60
  text "-" at 11687.54,1856.5 h60
  text "-" at 12553.3,1856.5 h60
  text "5" at 5083.38,1706.5 h60
  text "148.00mil (3.759mm)" at 5683.22,1706.5 h60
  text "PTH" at 6832.88,1706.5 h60
  text "Round" at 7338.76,1706.5 h60
  text "Top Layer - Bottom Layer" at 8072.56,1706.5 h60
  text "Pad" at 9572.11,1706.5 h60
  text "Rounded" at 10161.96,1706.5 h60
  text "c559h376" at 10907.76,1706.5 h60
  text "-" at 11687.54,1706.5 h60
  text "-" at 12553.3,1706.5 h60
  text "333 Total" at 5083.38,1556.5 h60

## Dimensions
0,0 to 750,0 on Dimensions
0,3250 to 0,0 on Dimensions
750,0 to 750,1250 on Dimensions
4000,3250 to 4000,1250 on Dimensions
4000,3250 to 0,3250 on Dimensions

## Text inside footprints (layer, text, board x,y; h text height)
J13: Top Overlay "1" at 201.84,689.56 h39.37 r180